# Altium PCB PCB1.PcbDoc (part 1 of 2)
Units mm, origin at the board's own origin, x right, y up, seen from the top; angles counter-clockwise.
Board outline 99 x 99 mm, 4 copper layers (TOP, GND, P, BOT), stack 1.591 mm thick; 114 components, 75 nets, 421 pads, 154 vias.
Unrouted connection lines stored in the file: 105.
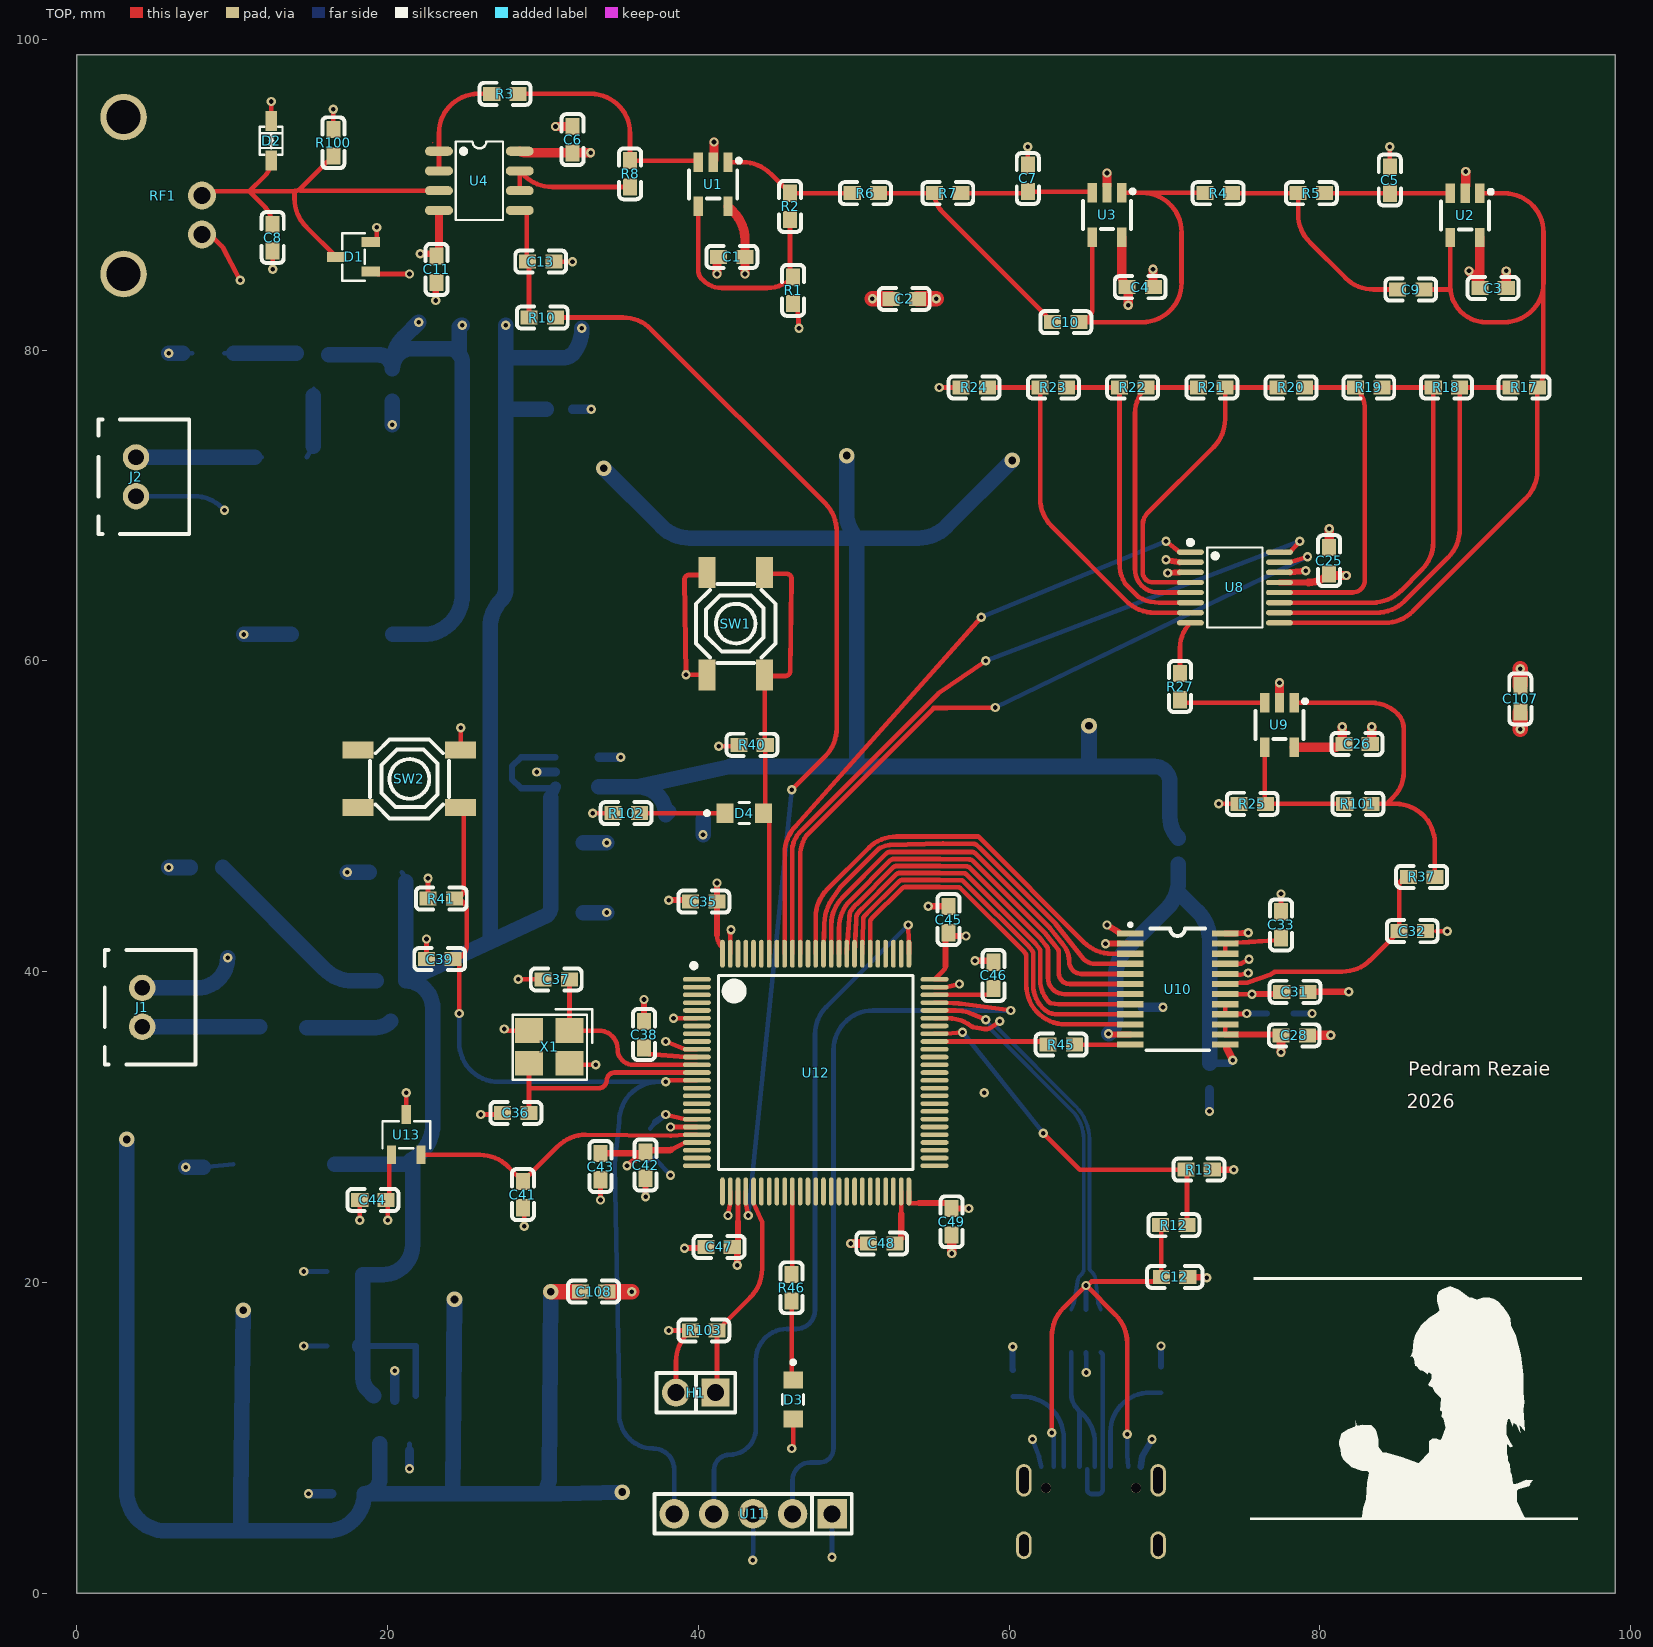
[diagram p0: TOP view]
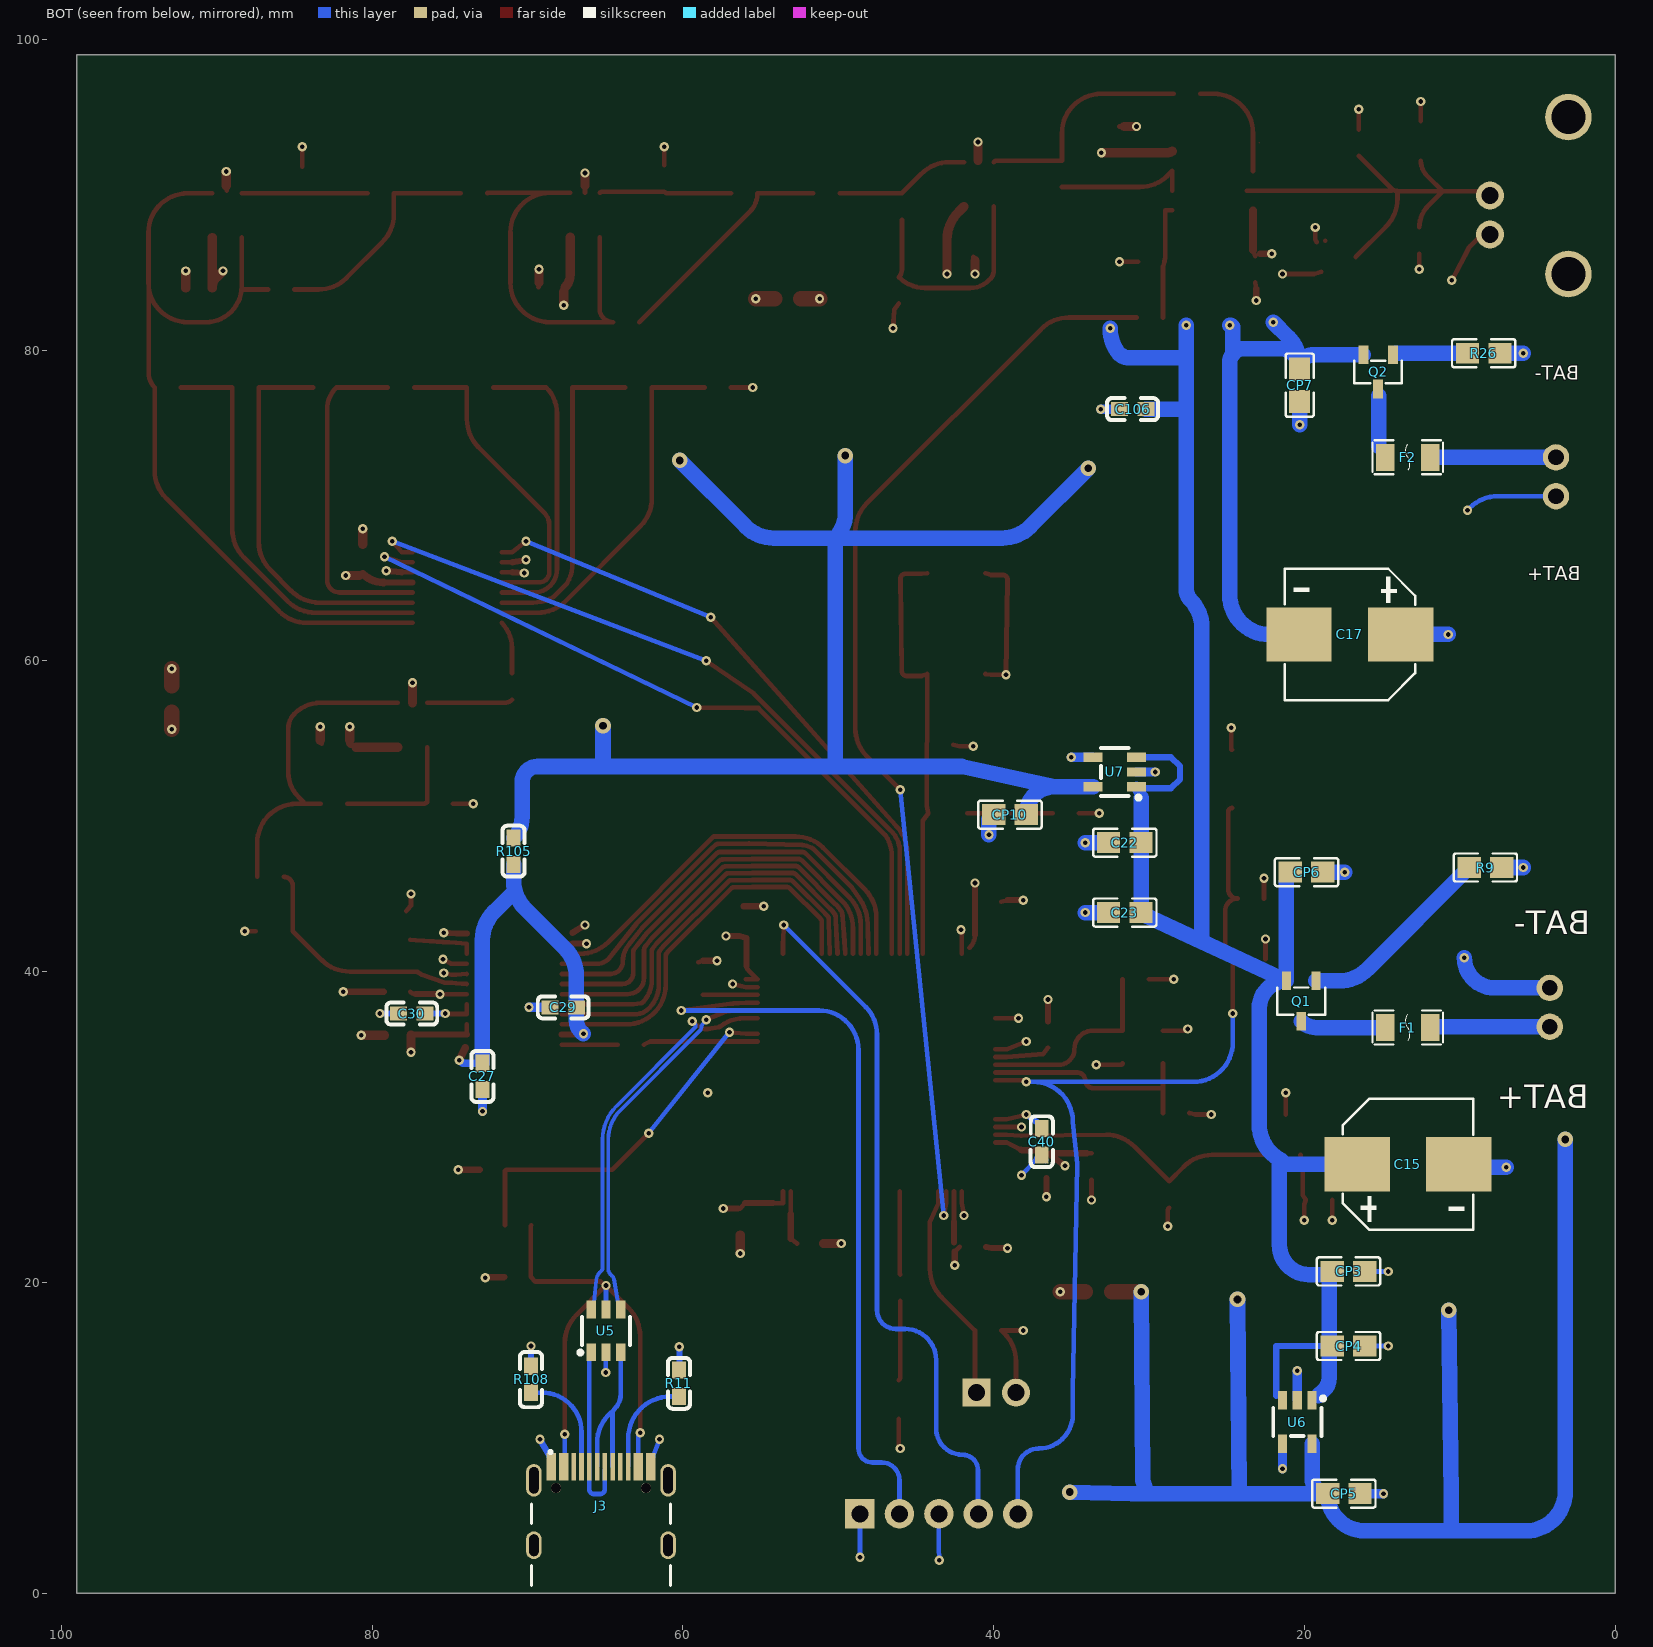
[diagram p1: BOT view, seen from below]
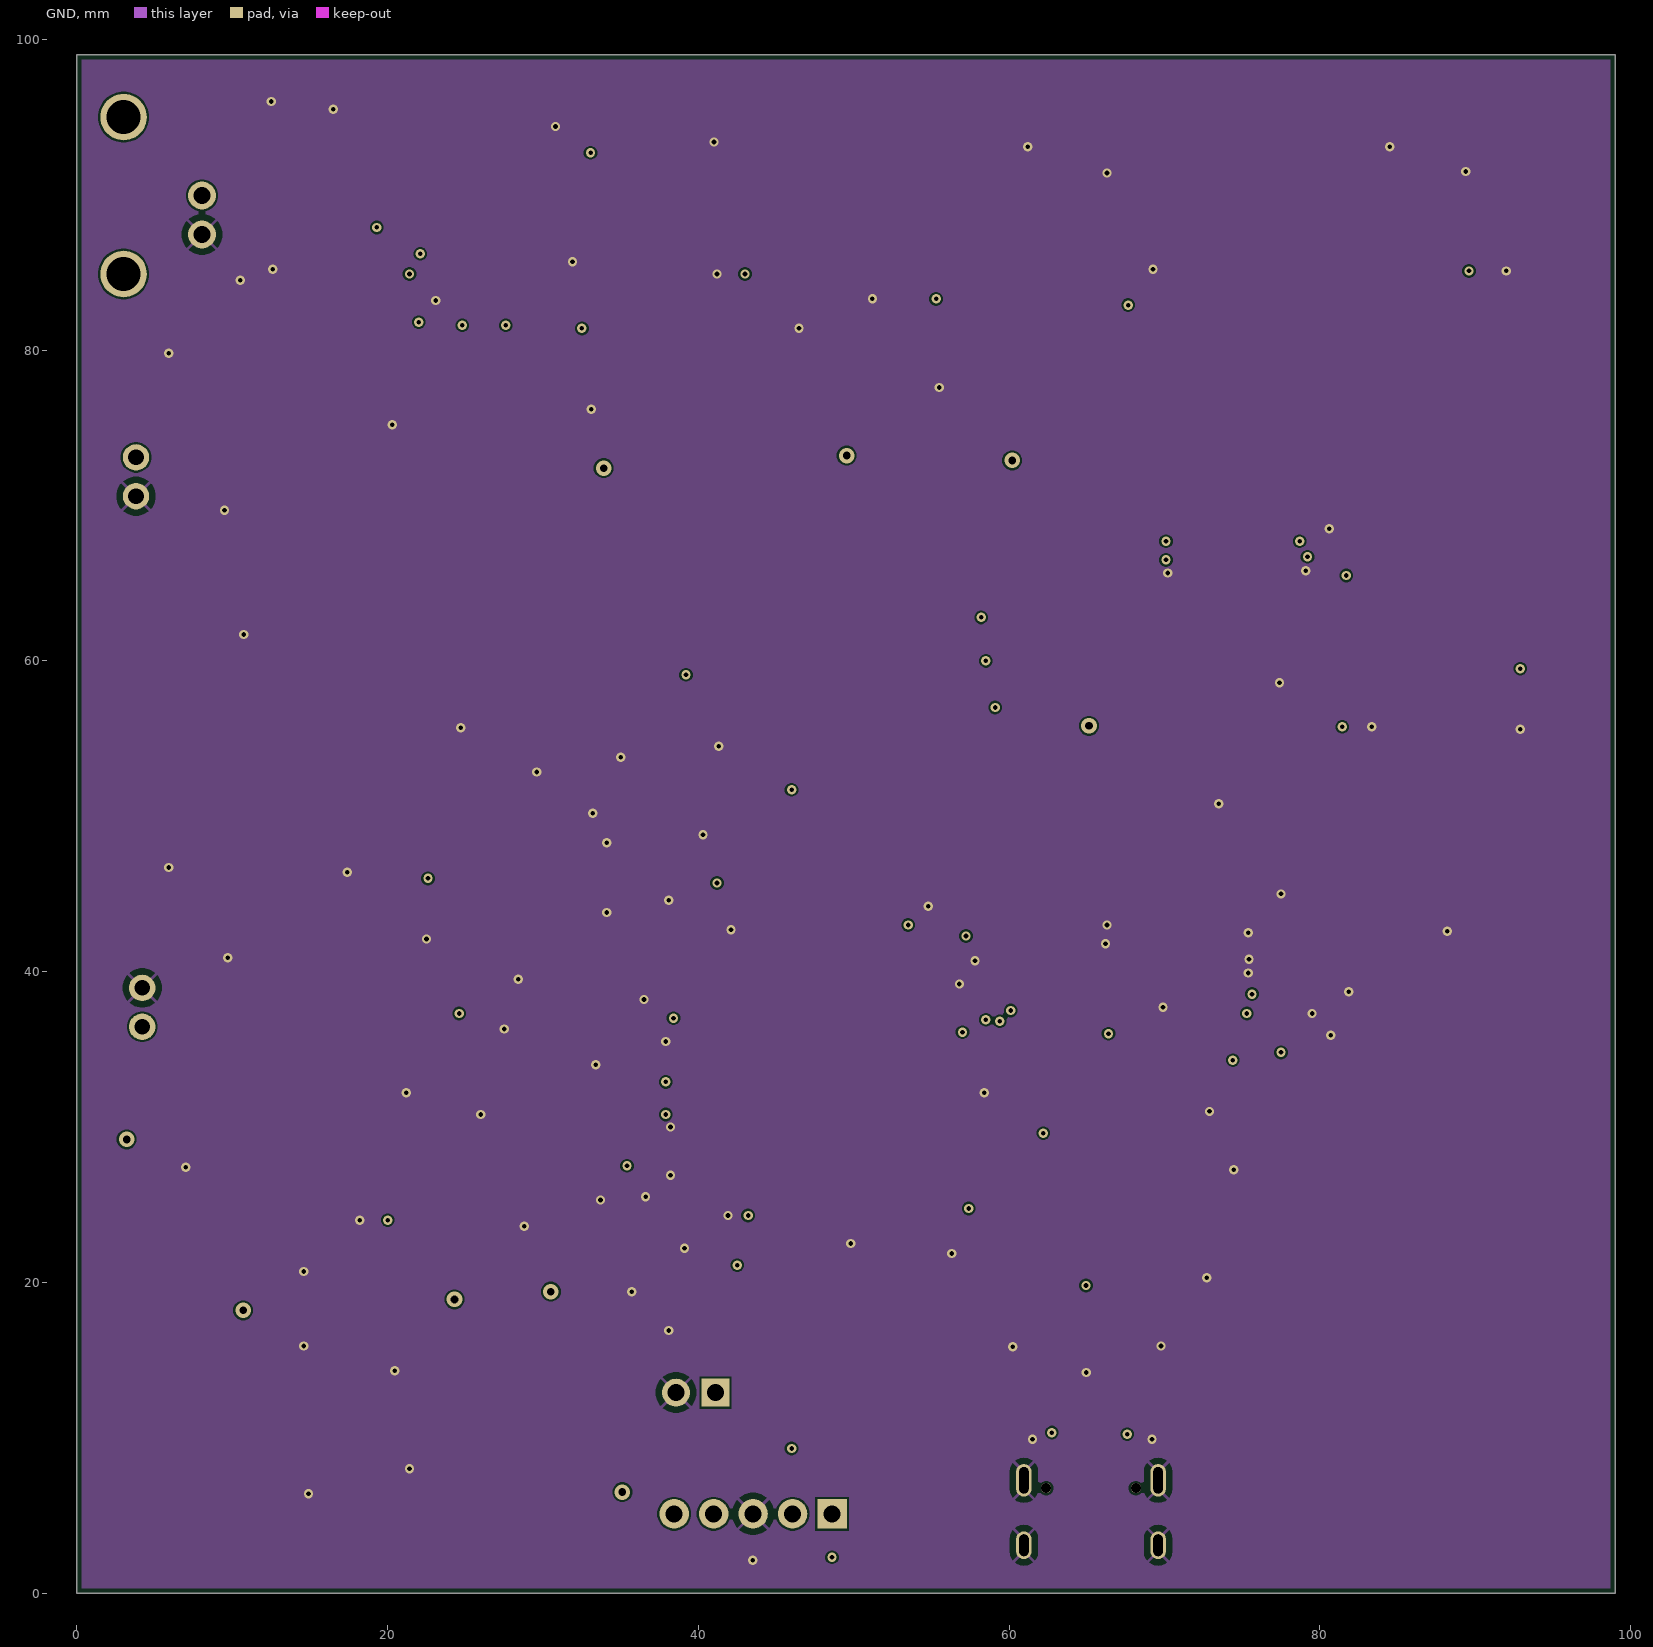
[diagram p2: GND]
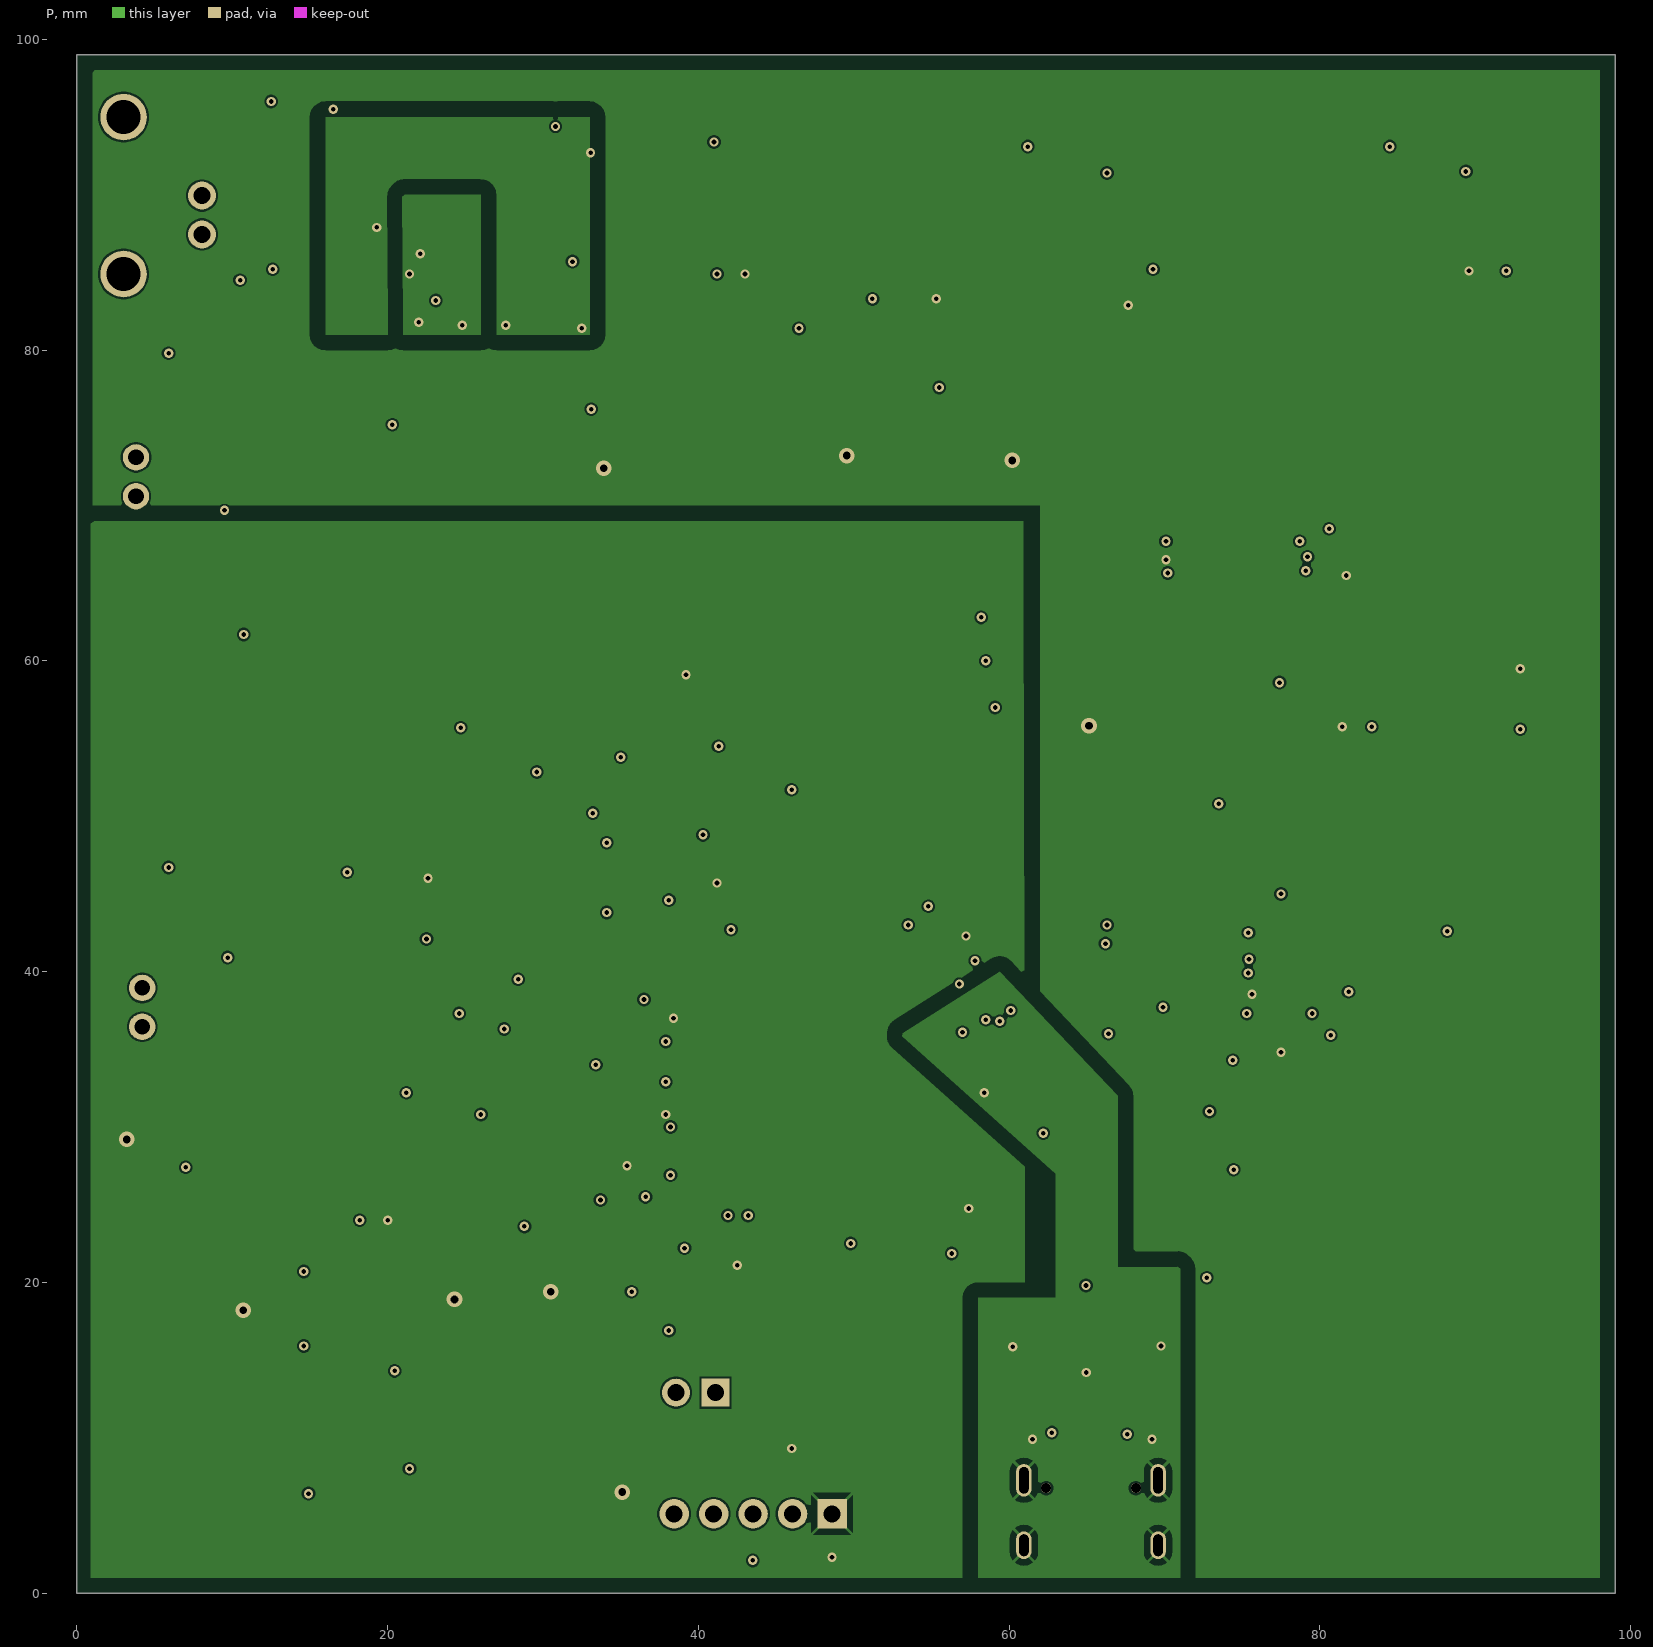
[diagram p3: P]

## Layer stack, top to bottom
Top Solder: solder mask 0.0102, Solder Resist, Dk 3.8
TOP: signal copper 0.035
Dielectric 1: prepreg 0.2104, PP-006, Dk 4.4
GND: signal copper 0.0175
Dielectric 2: dielectric 1.065, FR-4, Dk 4.4
P: signal copper 0.0175
Dielectric 3: prepreg 0.2104, PP-006, Dk 4.4
BOT: signal copper 0.035
Bottom Solder: solder mask 0.0102, Solder Resist, Dk 3.8

## Board outline
0,0 0,99 99,99 99,0

## Design rules (kind name [scope] priority, off if disabled: settings)
BoardOutlineClearance [All] p1: gap=0.254 ignorepadtopadclearanceinfootprint=FALSE except(0: Arc-SplitContinuation Track-SplitContinuation SMDPad-SplitContinuation THPad-SplitContinuation Via-SplitContinuation Fill-SplitContinuation Poly-SplitContinuation Region-SplitContinuation Text-SplitContinuation; 0.3: Arc-OutlineEdge Track-OutlineEdge SMDPad-OutlineEdge Fill-OutlineEdge Poly-OutlineEdge Region-OutlineEdge Text-OutlineEdge; 0.5: THPad-OutlineEdge Via-OutlineEdge)
Clearance [All] p1: gap=0.127 ignorepadtopadclearanceinfootprint=FALSE except(1: Fill-Fill Fill-Poly Fill-Region Poly-Poly Poly-Region Region-Region)
ComponentClearance [All] p1: gap=1.5 collisioncheckmode=3 verticalgap=2540 showdistances=TRUE
DiffPairsRouting USB [InDifferentialPair('USB')] p1: maxlimit=0.127 minlimit=0.127 mostfreqgap=0.127 toplayer_minwidth=0.24 toplayer_maxwidth=0.24 toplayer_prefwidth=0.24 midlayer1_minwidth=0.152 midlayer1_maxwidth=0.152 midlayer1_prefwidth=0.152 midlayer2_minwidth=0.152 midlayer2_maxwidth=0.152 midlayer2_prefwidth=0.152 bottomlayer_minwidth=0.24 bottomlayer_maxwidth=0.24 bottomlayer_prefwidth=0.24 impedanceprofiledriven=TRUE impedanceprofileid={34407DA7-253E-4A37-A9AF-6DE2CBFCFED3} impedanceprofilevalue=90.000000 maxuncoupledlength=12.7
HoleSize [All] p1: absolutevalues=TRUE maxlimit=2539.975 minlimit=0.3 maxpercent=80.000 minpercent=20.000
HoleToHoleClearance [All] p1: gap=0.5 allowstackedmicrovias=TRUE
MinimumAnnularRing [All] p1: minimumring=0.15
MinimumSolderMaskSliver [All] p1: minsoldermaskwidth=0.1
PolygonConnect [All] p1: thpad.connectstyle=Relief thpad.reliefconductorwidth=0.2 thpad.reliefentries=4 thpad.polygonreliefangle="45 Angle" thpad.airgapwidth=0.4 smdpad.connectstyle=Relief smdpad.reliefconductorwidth=0.25 smdpad.reliefentries=4 smdpad.polygonreliefangle="45 Angle" smdpad.airgapwidth=0.38 via.connectstyle=Direct via.reliefconductorwidth=0.254 via.reliefentries=4 via.polygonreliefangle="90 Angle" via.airgapwidth=0.254
RoutingVias [All] p1: holewidth=0.3 width=0.6 viastyle="Through Hole" minholewidth=0.3 minwidth=0.6 maxholewidth=0.5 maxwidth=0.8
SilkToSolderMaskClearance [IsPad] p1: minsilkscreentomaskgap=0 clearancetoexposedcopper=TRUE
SolderMaskExpansion [All] p1: expansion=0.102 istentingtop=FALSE
SupplyNets "Schematic Supply Nets_1" [InNet('3V3A_D')] p1: voltage=0.000
SupplyNets "Schematic Supply Nets_2" [InNet('GND')] p2: voltage=0.000
SupplyNets "Schematic Supply Nets_5" [InNet('3V3D')] p3: voltage=0.000
SupplyNets "Schematic Supply Nets_4" [InNet('3V3A')] p4: voltage=0.000
SupplyNets "Schematic Supply Nets_3" [InNet('VBAT+')] p5: voltage=0.000
SupplyNets "Schematic Supply Nets" [InNet('VBAT-')] p6: voltage=0.000
Width [All] p1: maxlimit=1 minlimit=0.2 preferedwidth=0.3 minimp=50.000000 maximp=50.000000 favimp=50.000000
24 further rules are at their usual default settings.

## Classes and differential pairs
component class STM32: C35 C36 C37 C38 C39 C40 C41 C42 C43 C44 C45 C46 C47 C48 C49 C108 D2 D3 D4 H1 R40 R41 R45 R46 R102 R103 RF1 SW1 SW2 U11 U12 U13 X1
component class PGA: C25 C26 R17 R18 R19 R20 R21 R22 R23 R24 R25 R27 R101 U8 U9
component class POWER: C12 C15 C17 C22 C23 CP3 CP4 CP5 CP6 CP7 CP10 F1 F2 J1 J2 J3 Q1 Q2 R9 R11 R12 R13 R26 R105 R108 U5 U6 U7
component class LEVELSHIFT: C1 C2 C3 C4 C5 C6 C7 C8 C9 C10 C11 C13 C106 C107 D1 R1 R2 R3 R4 R5 R6 R7 R8 R10 R100 U1 U2 U3 U4
component class ADC: C27 C28 C29 C30 C31 C32 C33 R37 U10

## Components (designator, comment, footprint, x,y, rotation, side; value= is the part's Value field where it differs from the comment)
C1 "Cap" 0603 42.15,86 r180 top value=100nF
C2 "Cap" 0603 53.25,83.3 r180 top value=10uF
C3 "Cap" 0603 91.15,84 r0 top value=100nF
C4 "Cap" 0603 68.437,84.05 r0 top value=100nF
C5 "Cap" 0603 84.5,90.95 r90 top value=200pF
C6 "Cap" 0603 31.9,93.55 r270 top value=100nF
C7 "Cap" 0603 61.2,91.05 r270 top value=560pF
C8 "Cap" 0603 12.6,87.25 r90 top value=3.3pF
C9 "Cap" 0603 85.85,83.9 r180 top value=2nF
C10 "Cap" 0603 63.65,81.8 r180 top value=750pF
C11 "Cap" 0603 23.15,85.2 r270 top value=100nF
C12 "Cap" 0603 70.65,20.35 r180 top value=100nF
C13 "Cap" 0603 29.85,85.7 r180 top value=1uF
C15 "100uF" CAP-SMD_BD8.0-L8.3-W8.3-FD 13.333,27.6 r180 bottom
C17 "100uF" CAP-SMD_BD8.0-L8.3-W8.3-FD 17.067,61.7 r0 bottom
C22 "Cap" 0805 31.592,48.286 r180 bottom value=100nF
C23 "Cap" 0805 31.592,43.786 r180 bottom value=10uF
C25 "Cap" 0603 80.6,66.45 r270 top value=100nF
C26 "Cap" 0603 82.391,54.659 r0 top value=100nF
C27 "Cap" 0603 72.9,33.25 r270 bottom value=0.1uF
C28 "Cap" 0603 78.35,35.9 r0 top value=0.1uF
C29 "Cap" 0603 67.7,37.7 r180 bottom value=0.1uF
C30 "Cap" 0603 77.45,37.3 r180 bottom value=10uF
C31 "Cap" 0603 78.4,38.7 r180 top value=0.1uF
C32 "Cap" 0603 85.95,42.6 r0 top value=47pF
C33 "Cap" 0603 77.5,43 r270 top value=10uF
C35 "Cap" 0603 40.35,44.5 r0 top value=100nF
C36 "Cap" 0603 28.25,30.9 r0 top value=22pF
C37 "Cap" 0603 30.85,39.5 r0 top value=22pF
C38 "Cap" 0603 36.5,35.95 r270 top value=100nF
C39 "Cap" 0603 23.35,40.8 r0 top value=100nF
C40 "Cap" 0603 36.9,29.05 r90 bottom value=100nF
C41 "Cap" 0603 28.7,25.65 r90 top value=100nF
C42 "Cap" 0603 36.6,27.55 r90 top value=100nF
C43 "Cap" 0603 33.7,27.45 r90 top value=1uF
C44 "Cap" 0603 19.05,25.3 r0 top value=100nF
C45 "Cap" 0603 56.1,43.35 r270 top value=100nF
C46 "Cap" 0603 59,39.75 r90 top value=2,2uF
C47 "Cap" 0603 41.329,22.279 r0 top value=100nF
C48 "Cap" 0603 51.8,22.5 r180 top value=2,2uF
C49 "Cap" 0603 56.3,23.9 r90 top value=100nF
C106 "Cap" 0603 31.05,76.2 r0 bottom value=10uF
C107 "Cap" 0603 92.9,57.55 r270 top value=10uF
C108 "Cap" 0603 33.25,19.4 r180 top value=10uF
CP3 "Cap" 0805 17.118,20.714 r0 bottom value=100nF (schematic designator C19)
CP4 "Cap" 0805 17.118,15.914 r0 bottom value=10uF (schematic designator C20)
CP5 "Cap" 0805 17.418,6.414 r0 bottom value=10uF (schematic designator C21)
CP6 "Cap" 0805 19.818,46.414 r0 bottom value=100nF (schematic designator C16)
CP7 "Cap" 0805 20.314,77.782 r270 bottom value=100nF (schematic designator C18)
CP10 "Cap" 0805 38.982,50.086 r180 bottom value=10uF (schematic designator C24)
D1 "YLED0805YG" SOT-23-3 17.8,86 r0 top
D2 "GBLC08CI-LF-T7" SOD-323_L1.8-W1.3-LS2.5-BI 12.5,93.475 r90 top
D3 "YLED0805YG" FP-LTST-C171KGKT-MFG 46.1,12.45 r270 top
D4 "YLED0805YG" FP-LTST-C171KGKT-MFG 42.95,50.2 r0 top
F1 "nSMD050-33V" 1206 13.345,36.4 r0 bottom
F2 "nSMD050-33V" 1206 13.345,73.1 r0 bottom
H1 "A2541WV-2P" HDR-TH_P2.54-H-M_A2541WV-2P 39.83,12.9 r180 top
J1 "B2B-XH-A(LF)(SN)" B2B-XH-A(LF)(SN) 4.2,37.7 r270 top
J2 "B2B-XH-A(LF)(SN)" B2B-XH-A(LF)(SN) 3.8,71.85 r270 top
J3 "GCT_USB4930-00-A_REVA" GCT_USB4930-00-A_REVA 65.27,5.452 r180 bottom
Q1 "AO3401A" SOT-23-3_L2.9-W1.6-P1.90-LS2.8-BR 20.2,38.1 r90 bottom
Q2 "AO3400A" SOT-23-3_L2.9-W1.3-P1.90-LS2.4-BR 15.25,78.6 r90 bottom
R1 "Res1" 0603 46.1,83.85 r90 top value=1k
R2 "Res1" 0603 45.9,89.25 r90 top value=1k
R3 "Res1" 0603 27.55,96.5 r0 top value=1k
R4 "Res1" 0603 73.45,90.1 r180 top value=64.9
R5 "Res1" 0603 79.45,90.1 r180 top value=237
R6 "Res1" 0603 50.75,90.1 r180 top value=82.5
R7 "Res1" 0603 56.05,90.1 r180 top value=178
R8 "Res1" 0603 35.6,91.35 r90 top value=1k
R9 "Res1" 0805 8.382,46.686 r180 bottom value=100k (schematic designator R14)
R10 "Res1" 0603 29.95,82.1 r0 top value=100k
R11 "Res1" 0603 60.25,13.5 r90 bottom value=5.1K
R12 "Res1" 0603 70.6,23.675 r0 top value=47k
R13 "Res1" 0603 72.225,27.25 r180 top value=22k
R17 "Res1" 0603 93.15,77.6 r0 top value=47
R18 "Res1" 0603 88.15,77.6 r0 top value=47
R19 "Res1" 0603 83.15,77.6 r0 top value=47
R20 "Res1" 0603 78.15,77.6 r0 top value=47
R21 "Res1" 0603 73.05,77.6 r0 top value=47
R22 "Res1" 0603 67.95,77.6 r0 top value=47
R23 "Res1" 0603 62.85,77.6 r0 top value=47
R24 "Res1" 0603 57.75,77.6 r0 top value=47
R25 "Res1" 0603 75.65,50.8 r0 top value=143
R26 "Res1" 0805 8.418,79.814 r0 bottom value=100k (schematic designator R104)
R27 "Res1" 0603 71,58.35 r90 top value=100
R37 "Res1" 0603 86.55,46.1 r180 top value=47
R40 "Res1" 0603 43.45,54.6 r180 top value=10k
R41 "Res1" 0603 23.45,44.7 r0 top value=10k
R45 "Res1" 0603 63.35,35.3 r0 top value=22
R46 "Res1" 0603 46,19.65 r270 top value=1k
R100 "Res1" 0603 16.5,93.35 r270 top value=1M
R101 "Res1" 0603 82.45,50.8 r0 top value=1K
R102 "Res1" 0603 35.35,50.2 r180 top value=1k
R103 "Res1" 0603 40.35,16.9 r180 top value=1k
R105 "Res1" 0603 70.9,47.75 r270 bottom value=47
R108 "Res1" 0603 69.775,13.75 r90 bottom value=5.1K
RF1 "3GHz" ANT-TH_KH-BNC50-3511 5.525,89.95 r270 top
SW1 "TS-1187A-B-A-B" SKQGABE010 42.4,62.4 r270 top
SW2 "TS-1187A-B-A-B" SKQGABE010 21.4,52.4 r180 top
U1 "OPA356AIDBVT" SOT-23-5 40.95,90.675 r90 top
U2 "OPA356AIDBVT" SOT-23-5 89.35,88.675 r90 top
U3 "OPA356AIDBVT" SOT-23-5 66.3,88.7 r90 top
U4 "OPA1656IDR" SOIC-8 25.9,90.9 r270 top
U5 "USBLC6-2SC6_C5261088" SOT-23-6_L2.9-W1.6-P0.95-LS2.8-BR 64.95,16.875 r270 bottom
U6 "AP2112K-3.3TRG1(MS)" SOT-23-5_L2.9-W1.6-P0.95-LS2.7-BR 20.45,11 r90 bottom
U7 "AP2112K-3.3TRG1(MS)" SOT-23-5_L2.9-W1.6-P0.95-LS2.7-BR 32.2,52.85 r180 bottom
U8 "ADG708CRUZ-REEL7" TSSOP-16 74.534,64.725 r270 top
U9 "OPA356AIDBVT" SOT-23-5 77.4,55.875 r90 top
U10 "ADC1173CIMTCX/NOPB" TSSOP-24 70.852,38.875 r0 top
U11 "2541WV-05P" HDR-TH_5P-P2.54-V-M 43.52,5.1 r180 top
U12 "STM32F407VGT6" LQFP-100_L14.0-W14.0-P0.50-LS16.0-BL 47.55,33.5 r270 top
U13 "REF3030AIDBZR" SOT-23-3_L2.9-W1.6-P1.90-LS2.8-BR_2 21.2,29.5 r270 top
X1 "8MHz" CRYSTAL-SMD_4P-L3.2-W2.5-BL 30.4,35.15 r180 top

## Footprints (in the part's own frame and the unit in brackets; to place one, negate y for a bottom-side part, rotate by r counter-clockwise, add the part's x,y. Pads: shape width x height; smd on the part's side, far side on the other; paste and mask are expansions set on the pad)
0603 [mm]
  rect 1.1x0.9 smd: 1(-0.85,0) 2(0.85,0)
  silkscreen extent -1.64,-0.71 1.64,0.71
0805 [mm]
  rect 1.5x1.35 smd mask+0.051: 1(-1.008,0.014) 2(1.082,0.014)
  silkscreen extent -2,-0.89 2.08,0.92
1206 [mm]
  rect 1.19x1.728 smd: 1(-1.445,0) 2(1.445,0)
  silkscreen extent -2.27,-1.09 2.27,1.09
ANT-TH_KH-BNC50-3511 [mm]
  round 1.8 hole 1.1 paste-2539.97 mask+0.05: 1(0,2.525) 2(2.5,2.525)
  round 3 hole 2.2 paste-2539.97 mask+0.05: 3(5.05,-2.525) 4(-5.05,-2.525)
B2B-XH-A(LF)(SN) [mm]
  round 1.7 hole 1: 1(1.25,0) 2(-1.25,0)
  silkscreen extent -3.68,-2.41 3.68,3.43
CAP-SMD_BD8.0-L8.3-W8.3-FD [mm]
  rect 4.2x3.5 smd: 1(-3.267,0) 2(3.267,0)
  silkscreen extent -4.2,-4.23 4.2,4.23
CRYSTAL-SMD_4P-L3.2-W2.5-BL [mm]
  rect 1.8x1.6 smd: 1(-1.3,-1.05) 2(1.3,-1.05) 3(1.3,1.05) 4(-1.3,1.05)
  silkscreen extent -2.78,-2.42 2.35,2.1
FP-LTST-C171KGKT-MFG [mm]
  rect 1.1x1.25 smd paste+0 mask+0: 1(-1.25,0) 2(1.25,0)
  silkscreen extent -2.52,-0.67 0.33,0.67, body extent -1.9,-0.77 1.9,0.77, height 0.25
GCT_USB4930-00-A_REVA [mm]
  rect 0.6x1.75 smd paste+0 mask+0.025: A1_B12(-3.2,2.678) A4_B9(-2.4,2.678) B1_A12(3.2,2.678) B4_A9(2.4,2.678)
  rect 0.3x1.75 smd paste+0 mask+0.025: A5(-1.25,2.678) A6(-0.25,2.678) A7(0.25,2.678) A8(1.25,2.678) B5(1.75,2.678) B6(0.75,2.678) B7(-0.75,2.678) B8(-1.75,2.678)
  oval 1x2.1 hole 0.6 slot 1.7 at 90 deg mask+0.102: SH1(-4.32,1.803) SH2(4.32,1.803)
  oval 1x1.8 hole 0.6 slot 1.4 at 90 deg mask+0.102: SH3(-4.32,-2.377) SH4(4.32,-2.377)
  round 0.65 hole 0.65 unplated mask+0: ""(-2.89,1.303) ""(2.89,1.303)
  silkscreen extent -4.47,-4.98 4.47,3.72
HDR-TH_5P-P2.54-V-M [mm]
  rect 1.9x1.9 hole 1.1: 1(-5.08,0)
  round 1.9 hole 1.1: 2(-2.54,0) 3(0,0) 4(2.54,0) 5(5.08,0)
  silkscreen extent -6.35,-1.27 6.35,1.27
HDR-TH_P2.54-H-M_A2541WV-2P [mm]
  rect 1.8x1.8 hole 1.1: 1(-1.27,0)
  round 1.8 hole 1.1: 2(1.27,0)
  silkscreen extent -2.54,-1.27 2.54,1.27
LQFP-100_L14.0-W14.0-P0.50-LS16.0-BL [mm]
  oval 0.3x1.8 smd mask+0.025: 1(-6,-7.65) 2(-5.5,-7.65) 3(-5,-7.65) 4(-4.5,-7.65) 5(-4,-7.65) 6(-3.5,-7.65) 7(-3,-7.65) 8(-2.5,-7.65) 9(-2,-7.65) 10(-1.5,-7.65) 11(-1,-7.65) 12(-0.5,-7.65) 13(0,-7.65) 14(0.5,-7.65) 15(1,-7.65) 16(1.5,-7.65) 17(2,-7.65) 18(2.5,-7.65) 19(3,-7.65) 20(3.5,-7.65) 21(4,-7.65) 22(4.5,-7.65) 23(5,-7.65) 24(5.5,-7.65) 25(6,-7.65) 51(6,7.65) 52(5.5,7.65) 53(5,7.65) 54(4.5,7.65) 55(4,7.65) 56(3.5,7.65) 57(3,7.65) 58(2.5,7.65) 59(2,7.65) 60(1.5,7.65) 61(1,7.65) 62(0.5,7.65) 63(0,7.65) 64(-0.5,7.65) 65(-1,7.65) 66(-1.5,7.65) 67(-2,7.65) 68(-2.5,7.65) 69(-3,7.65) 70(-3.5,7.65) 71(-4,7.65) 72(-4.5,7.65) 73(-5,7.65) 74(-5.5,7.65) 75(-6,7.65)
  oval 1.8x0.3 smd mask+0.025: 26(7.65,-6) 27(7.65,-5.5) 28(7.65,-5) 29(7.65,-4.5) 30(7.65,-4) 31(7.65,-3.5) 32(7.65,-3) 33(7.65,-2.5) 34(7.65,-2) 35(7.65,-1.5) 36(7.65,-1) 37(7.65,-0.5) 38(7.65,0) 39(7.65,0.5) 40(7.65,1) 41(7.65,1.5) 42(7.65,2) 43(7.65,2.5) 44(7.65,3) 45(7.65,3.5) 46(7.65,4) 47(7.65,4.5) 48(7.65,5) 49(7.65,5.5) 50(7.65,6) 76(-7.65,6) 77(-7.65,5.5) 78(-7.65,5) 79(-7.65,4.5) 80(-7.65,4) 81(-7.65,3.5) 82(-7.65,3) 83(-7.65,2.5) 84(-7.65,2) 85(-7.65,1.5) 86(-7.65,1) 87(-7.65,0.5) 88(-7.65,0) 89(-7.65,-0.5) 90(-7.65,-1) 91(-7.65,-1.5) 92(-7.65,-2) 93(-7.65,-2.5) 94(-7.65,-3) 95(-7.65,-3.5) 96(-7.65,-4) 97(-7.65,-4.5) 98(-7.65,-5) 99(-7.65,-5.5) 100(-7.65,-6)
  silkscreen extent -7.03,-8 6.25,6.25
SKQGABE010 [mm]
  rect 2x1.1 smd: 1(-3.3,1.85) 2(3.3,1.85) 3(-3.3,-1.85) 4(3.3,-1.85)
  silkscreen extent -2.55,-2.55 2.55,2.55
SOD-323_L1.8-W1.3-LS2.5-BI [mm]
  rect 1.3x0.75 smd: 1(-1.275,0) 2(1.275,0)
  silkscreen extent -0.9,-0.73 0.9,0.73
SOIC-8 [mm]
  oval 0.588x1.8 smd paste+0 mask+0.051: 1(-1.905,-2.6) 2(-0.635,-2.6) 3(0.635,-2.6) 4(1.905,-2.6) 5(1.905,2.6) 6(0.635,2.6) 7(-0.635,2.6) 8(-1.905,2.6)
  TOP region: -2.42,-3 -2.42,-2.988 -2.438,-2.97 -2.462,-2.97 -2.48,-2.988 -2.48,-3 -2.48,-3.012 -2.462,-3.03 -2.438,-3.03 -2.42,-3.012 -2.42,-3 -2.42,-3
  silkscreen extent -2.53,-1.52 2.53,1.52
SOT-23-3 [mm]
  rect 1.2x0.65 smd: 1(1.1,-0.95) 2(1.1,0.95) 3(-1.1,0)
  silkscreen extent -0.73,-1.53 0.73,1.53
SOT-23-3_L2.9-W1.3-P1.90-LS2.4-BR [mm]
  rect 1.2x0.65 smd: 1(1.1,-0.95) 2(1.1,0.95) 3(-1.1,0)
  silkscreen extent -0.73,-1.53 0.73,1.53
SOT-23-3_L2.9-W1.6-P1.90-LS2.8-BR [mm]
  rect 1.2x0.6 smd paste+0 mask+0.051: 1(1.3,-0.95) 2(1.3,0.95) 3(-1.3,0)
  silkscreen extent -0.88,-1.54 0.88,1.54
SOT-23-3_L2.9-W1.6-P1.90-LS2.8-BR_2 [mm]
  rect 1.2x0.6 smd paste+0 mask+0.051: 1(1.3,-0.95) 2(1.3,0.95) 3(-1.3,0)
  silkscreen extent -0.88,-1.54 0.88,1.54
SOT-23-5 [mm]
  rect 1.25x0.6 smd: 1(1.425,-0.95) 2(1.425,0) 3(1.425,0.95) 4(-1.425,0.95) 5(-1.425,-0.95)
  silkscreen extent -0.9,-1.78 1.65,1.55
SOT-23-5_L2.9-W1.6-P0.95-LS2.7-BR [mm] "AP2112K-3.3TRG1(MS)"
  rect 1.2x0.6 smd: 1(1.4,-0.95) 2(1.4,0) 3(1.4,0.95) 4(-1.4,0.95) 5(-1.4,-0.95)
  silkscreen extent -0.9,-1.78 1.65,1.55
SOT-23-6_L2.9-W1.6-P0.95-LS2.8-BR [mm]
  rect 1.15x0.6 smd paste+0 mask+0.051: 1(1.375,-0.95) 2(1.375,0) 3(1.375,0.95) 4(-1.375,0.95) 5(-1.375,0) 6(-1.375,-0.95)
  silkscreen extent -0.9,-1.78 1.52,1.55
TSSOP-16 [mm]
  oval 0.343x1.731 smd: 1(-2.275,-2.866) 2(-1.625,-2.866) 3(-0.975,-2.866) 4(-0.325,-2.866) 5(0.325,-2.866) 6(0.975,-2.866) 7(1.625,-2.866) 8(2.275,-2.866) 9(2.275,2.866) 10(1.625,2.866) 11(0.975,2.866) 12(0.325,2.866) 13(-0.325,2.866) 14(-0.975,2.866) 15(-1.625,2.866) 16(-2.275,2.866)
  silkscreen extent -3.05,-3.02 2.58,1.77
TSSOP-24 [mm]
  rect 1.7x0.4 smd mask+0.05: 1(-3.048,3.575) 2(-3.048,2.925) 3(-3.048,2.275) 4(-3.048,1.625) 5(-3.048,0.975) 6(-3.048,0.325) 7(-3.048,-0.325) 8(-3.048,-0.975) 9(-3.048,-1.625) 10(-3.048,-2.275) 11(-3.048,-2.925) 12(-3.048,-3.575) 13(3.048,-3.575) 14(3.048,-2.925) 15(3.048,-2.275) 16(3.048,-1.625) 17(3.048,-0.975) 18(3.048,-0.325) 19(3.048,0.325) 20(3.048,0.975) 21(3.048,1.625) 22(3.048,2.275) 23(3.048,2.925) 24(3.048,3.575)
  silkscreen extent -3.13,-3.94 2.01,4.22

## Part data
C1 C2 C3 C4 C5 C6 C7 C8 C9 C10 C11 C12 C13 C22 C23 C25 C26 C27 C28 C29 C30 C31 C32 C33 C35 C36 C37 C38 C39 C40 C41 C42 C43 C44 C45 C46 C47 C48 C49 C106 C107 C108 CP3 CP4 CP5 CP6 CP7 CP10: "Capacitor", LatestRevisionDate=17-Jul-2002, LatestRevisionNote="Re-released for DXP Platform.", PackageDescription="Radial Cap, Thru-Hole; 2 Leads; 0.3 in Pin Spacing", PackageReference=RAD-0.3, Published=8-Jun-2000, Publisher="Altium Limited"
C15 C17: library part VT1H101M0810, "100 µF, 50 V aluminum electrolytic capacitor, ±20%, SMD, 8 × 10.2 mm, 105°C"
D1: library part BAS7004E6327HTSA1, "Dual Schottky diode, 70 V, 70 mA, SOT-23 package."
D2: "Bidirectional TVS/ESD protection diode, 8 V standoff, 13.4 V clamping, 0.6 pF capacitance"
D3 D4: library part CMP-22017-000037-1, "LED GREEN CLEAR SMD", Case Code (Imperial)=0805, Case Code (Metric)=2012, Color=Green, Forward Current=30mA, Forward Voltage=2.4V, Lens Color=Colorless, Max Operating Temperature=85°C, Min Operating Temperature=-55°C, Package Quantity=1, Power Dissipation=75mW, Reverse Voltage=5V, Test Current=20mA, Case/Package=0805, Depth=1.25mm, Dominant Wavelength=571nm, Height=0.8mm, Illumination Color=Green, Lead Free="Lead Free", Length=2mm, Lens Style=Rectangular, Lens Transparency=Clear, Luminous Intensity=35mcd, Mount="Surface Mount", Number of Elements=1, Number of LEDs=1, Number of Pins=2, Packaging="Tape and Reel", Power Rating=75mW, Radiation Hardening=No, Viewing Angle=130°, Wavelength=574nm, Width=1.25mm
F1 F2: "Resettable PTC fuse, 0.5 A hold current, 33 V max"
H1: library part A2541WV-2P_C225477, "2-pin male pin header, 2.54 mm pitch, single-row, straight through-hole, 3 A, 250 V."
J1 J2: "2-pin JST XH series wire-to-board header, 2.5 mm pitch, straight through-hole, 3 A, 250 V"
J3: "Type C USB 2.0 Connector"
Q1: library part AO3401A_C5379091, "P-channel MOSFET, −30 V, −4 A, low RDS(on)"
Q2: library part AO3400A_C42419946, "N-channel MOSFET, 30 V, 5.7 A, low RDS(on)"
R1 R2 R3 R4 R5 R6 R7 R8 R9 R10 R11 R12 R13 R17 R18 R19 R20 R21 R22 R23 R24 R25 R26 R27 R37 R40 R41 R45 R46 R100 R101 R102 R103 R105 R108: "Resistor", LatestRevisionDate=17-Jul-2002, LatestRevisionNote="Re-released for DXP Platform.", PackageDescription="Axial Device, Thru-Hole; 2 Leads; 0.3 in Pin Spacing", PackageReference=AXIAL-0.3, Published=8-Jun-2000, Publisher="Altium Limited"
RF1: library part KH-BNC50-3511, "50 Ω right-angle BNC PCB connector, through-hole, DC–3 GHz, 9.5 mm interface"
SW1 SW2: "SMD tactile pushbutton switch, SPST-NO, 12 V, 50 mA, 5.1 × 5.1 × 1.5 mm."
U1 U2 U3 U9: "High-speed CMOS single operational amplifier, 200 MHz GBW, rail-to-rail output"
U4: "Dual FET-input audio op-amp, 2.9nV/√Hz, 53MHz GBW, SOIC-8"
U6 U7: "3.3 V, 600 mA fixed-output LDO regulator with enable"
U8: "8:1 low-voltage analog multiplexer/switch, 4.5 Ω max RON, 55 MHz bandwidth"
U10: "8-bit, 15 MSPS single-channel ADC, 3 V supply"
U11: "5-pin single-row male pin header, 2.54 mm pitch, through-hole, straight."
U13: "3.0 V precision voltage reference, ±0.2% accuracy, 25 mA output"
X1: library part 0132M4-8000F18DZNGL

## Via types
v1: diameter 0.6, hole 0.3, TOP to BOT, tented both sides, 137 vias
v2: diameter 1, hole 0.5, TOP to BOT, tented both sides, 9 vias
v3: diameter 0.6, hole 0.3, TOP to BOT, 8 vias

## Nets (pads, with @x,y where several pads share a name; then routed paths per layer and width w, separated by ;. In a path a pad name is that pad's centre, name@x,y a point inside that pad or via, vN(x,y) a via of type N, cw(c..) or ccw(c..) an arc to the next point about the centre after c; other vN are vias at no path point)
3V3A: C1.1 C2.1 C3.1 C4.1 C25.2 C26.1 C28.1 C31.2 C107.1 CP10.2 R105.1 U1.5 U2.5 U3.5 U7.5 U8.2 U8.13 U9.5 U10.14 U10.15 U10.18 | length 132.4
  TOP w0.3: C4.1@67.587,84.05 C4.1@67.662,83.75 ; U8.2@70.974,66.35 U8.2@71.668,66.35 ; U10.14@73.9,35.95 U10.15@73.9,36.6 ; U10.18@73.9,38.55 75.187,38.55 75.278,38.55 v1(75.634,38.55) ; C31.2@77.188,38.55 ccw(c77.188,39.062) C31.2@77.55,38.7 ; C28.1@77.45,35.95 C28.1@77.5,35.9 ; C26.1@81.038,54.45 ccw(c81.038,55.162) C26.1@81.541,54.659 cw(c81.783,54.9) C26.1@81.441,54.9
  TOP w0.4: v1(70.1,66.5) U8.2@70.974,66.35 ; U10.14@73.9,35.95 C28.1@77.45,35.95 ; v1(75.634,38.55) C31.2@77.188,38.55 ; U8.13@77.4,65.05 79.272,65.05
  TOP w0.5: 79.272,65.05 ccw(c79.272,66.928) C25.2@80.6,65.6
  TOP w0.6: U1.5@41.9,89.25 42.256,88.894 cw(c40.46,87.098) 43,87.098 C1.1@43,86 v1(43,84.9) ; U3.5@67.25,87.275 67.25,84.865 ccw(c68.402,84.865) C4.1@67.587,84.05 ; v1(67.662,82.9) C4.1@67.662,83.75 ; v1(77.5,34.8) C28.1@77.5,35.9 ; U9.5@78.35,54.45 C26.1@81.038,54.45 ; C25.2@80.841,65.5 v1(81.7,65.5) ; C26.1@81.441,54.9 v1(81.441,55.759) ; v1(89.6,85.1) 90.017,84.683 cw(c89.334,84) C3.1@90.3,84 U2.5@90.3,87.25
  TOP w1: C2.1@54.1,83.3 v1(55.3,83.3) ; C107.1@92.9,58.4 v1(92.9,59.5)
  BOT w1: U7.5@33.6,51.9 36.1,51.9 ; v2(33.9,72.4) 37.656,68.644 ccw(c39.452,70.44) 39.452,67.9 50.2,67.9 ; CP10.2@38.075,50.275 CP10.2@37.9,50.1 ccw(c36.1,50.1) 36.1,51.9 ; v2(49.541,73.217) 49.541,69.491 ccw(c51.791,69.491) 50.2,67.9 ; v2(60.2,72.9) 55.944,68.644 cw(c54.148,70.44) 54.148,67.9 50.2,67.9 ; v2(65.141,55.817) 65.141,53.2 ; R105.1@70.9,48.6 cw(c72.246,49.944) 70.344,49.944 70.344,52.201 ccw(c69.344,52.2) 69.344,53.2 65.141,53.2 ; 36.1,51.9 42.052,53.2 50.2,53.2 ; 50.2,53.2 50.2,67.9 ; 50.2,53.2 65.141,53.2
3V3A_D: C27.1 C29.2 R105.2 U10.11 U10.13 | length 28.1
  TOP w0.3: v1(66.4,36) ccw(c66.52,36.12) v1@66.52,35.95
  TOP w0.4: v1@66.52,35.95 U10.11@67.804,35.95
  TOP w0.5: 74,35.1 v1(74.4,34.3)
  BOT w0.5: C27.1@72.9,34.1 74,34.1 ccw(c74,34.6) v1(74.4,34.3)
  BOT w1: v1(66.4,36) ccw(c65.85,36.835) 66.85,36.833 C29.2@66.85,37.7 66.85,39.698 cw(c69.39,39.698) 67.594,41.494 70.156,44.056 ccw(c68.36,45.852) 70.9,45.852 R105.2@70.9,46.9 ; 70.9,45.1 72.156,43.844 cw(c70.36,42.048) 72.9,42.048 C27.1@72.9,34.1
3V3D: C35.2 C40.2 C42.2 C43.2 C44.2 C45.2 C47.2 C49.2 C108.2 CP5.2 D3.2 R41.1 SW1.3 SW1.4 U6.5 U11.1 U12.6 U12.19 U12.22 U12.28 U12.50 U12.75 U12.100 U13.1 | length 153.4
  TOP w0.3: v1(20,24) 20,25 C44.2@19.9,25.3 20.1,25.6 20.1,27.75 U13.1@20.25,28.2 ; R41.1@22.6,44.7 v1(22.6,46) ; C43.2@33.7,28.3 C43.2@34,28.31 ; C42.2@36.3,28.157 36.365,28.224 C42.2@36.6,28.4 C42.2@36.9,28.495 ; v1(37.9,30.8) 39.15,30.5 U12.19@39.9,30.5 ; 38.248,28.529 39.15,29 U12.22@39.9,29 ; v1(38.4,37) 39.15,37 U12.6@39.9,37 ; 39.104,65.226 v1(39.2,59.1) 40.175,59.1 SW1.4@40.525,59.15 ; 39.104,65.227 cw(c39.404,65.23) 39.404,65.53 40.175,65.53 SW1.3@40.525,65.65 ; 41.2,42.37 ccw(c42.395,42.37) U12.100@41.55,41.525 ; C47.2@42.179,22.279 C47.2@42.5,21.979 ; 42.55,23.9 U12.28@42.55,25.85 ; v1(46,9.3) ccw(c45.759,9.541) 46.1,9.541 D3.2@46.1,11.2 ; U12.50@53.55,25.85 53.55,25.1 54.2,25.1 ; 55.9,40.366 cw(c55.5,40.366) 55.783,40.083 U12.75@55.2,39.5 U12.75@55.95,39.5 ; C49.2@56,25.1 C49.2@56.3,24.75 ; C49.2@56.194,24.856 ccw(c56.45,25.112) C49.2@56.45,24.75
  TOP w0.4: C43.2@34,28.31 C42.2@36.3,28.31 ; v1(35.4,27.5) C42.2@36.3,28.157 ; C42.2@36.9,28.495 38.109,28.495 ccw(c38.109,28.795) 38.248,28.529 ; 41.2,42.37 C35.2@41.2,44.5 v1(41.2,45.7) ; v1(42.5,21.1) C47.2@42.5,21.979 ; C47.2@42.55,22.579 42.55,23.9 ; 54.2,25.1 C49.2@56,25.1 ; 55.9,40.366 55.9,42.15 56.35,42.291 v1(57.219,42.291) ; C49.2@56.45,24.75 v1(57.4,24.75)
  TOP w1: v2(30.5,19.4) C108.2@32.4,19.4
  BOT w0.3: C40.2@36.9,29.9 C40.2@37.2,30.3 ; v1(48.6,2.3) U11.1@48.6,5.1
  BOT w0.4: C40.2@37.2,30.3 v1(37.9,30.8)
  BOT w1: v2(3.2,29.2) 3.2,6.54 ccw(c5.74,6.54) 5.74,4 10.55,4 ; v2(10.7,18.2) 10.55,6.26 ccw(c11.55,6.247) 10.55,6.247 10.55,4 ; U6.5@19.5,9.6 19.5,7.4 cw(c18.5,7.4) CP5.2@18.5,6.4 ; v2(24.3,18.9) 24.2,6.4 ; v2(30.5,19.4) 30.405,7.392 cw(c29.405,7.4) 30.343,7.051 30.1,6.4 ; v2(35.1,6.5) 31.112,6.4 cw(c31.087,7.4) 31.087,6.4 30.1,6.4 ; 10.55,4 16.1,4 ccw(c16.1,6.4) CP5.2@18.5,6.4 ; CP5.2@18.5,6.4 24.2,6.4 ; 24.2,6.4 30.1,6.4
ADC_D0: U10.3 U12.88 | length 28.2
  TOP w0.3: U12.88@47.55,41.15 47.55,43.498 cw(c50.09,43.498) 48.294,45.294 50.956,47.956 cw(c52.752,46.16) 52.752,48.7 58,48.7 64.806,41.894 ccw(c66.602,43.69) 66.602,41.15 U10.3@67.804,41.15
ADC_D1: U10.4 U12.87 | length 27.6
  TOP w0.3: U12.87@48.05,41.15 48.101,43.077 cw(c51.09,42.998) 48.606,44.662 49.1,45.4 51.576,47.876 cw(c52.6,46.851) 51.592,47.892 cw(c52.6,46.851) 51.593,47.893 cw(c51.801,47.676) 51.64,47.93 cw(c52.752,46.16) 51.642,47.931 cw(c51.801,47.676) 51.692,47.956 52.056,48.097 cw(c52.341,47.359) 52.318,48.15 55.739,48.25 cw(c55.747,47.95) 55.751,48.25 57.725,48.219 ; 57.727,48.219 cw(c57.721,47.919) 57.933,48.131 58.133,47.93 62.96,43.104 cw(c62.747,42.892) 62.982,43.08 64.792,40.809 ccw(c65.025,40.997) 64.829,40.77 ccw(c65.558,41.621) 65.558,40.5 U10.4@67.804,40.5
ADC_D2: U10.5 U12.86 | length 27.3
  TOP w0.3: U12.86@48.55,41.15 48.55,42.998 cw(c51.09,42.998) 49.294,44.794 52.1,47.6 cw(c52.341,47.359) 52.341,47.7 57.603,47.7 ; 57.604,47.7 cw(c57.602,47.4) 57.813,47.613 57.976,47.451 cw(c57.448,46.919) 57.978,47.449 62.606,42.822 cw(c62.075,42.291) 62.608,42.82 62.625,42.802 cw(c62.412,42.591) 62.645,42.78 62.646,42.779 63.486,41.725 cw(c62.104,40.624) 63.871,40.638 ; 63.871,40.638 ccw(c64.658,40.637) 64.659,39.85 U10.5@67.804,39.85
ADC_D3: U10.6 U12.85 | length 27.1
  TOP w0.3: U12.85@49.05,41.15 49.05,42.798 cw(c51.59,42.798) 49.794,44.594 52.362,47.162 cw(c52.574,46.95) 52.574,47.25 53.32,47.25 55.547,47.25 cw(c55.547,46.95) 55.551,47.25 ; 55.552,47.25 57.453,47.219 57.454,47.219 cw(c57.447,46.919) 57.658,47.132 57.787,47.004 cw(c57.258,46.472) 57.788,47.003 62.269,42.522 cw(c61.739,41.991) 62.272,42.519 62.289,42.502 cw(c62.076,42.291) 62.309,42.48 62.31,42.478 62.786,41.88 ; 62.787,41.88 63.135,41.442 cw(c62.9,41.255) 63.2,41.258 63.2,39.9 ccw(c63.9,39.9) 63.9,39.2 U10.6@67.804,39.2
ADC_D4: U10.7 U12.84 | length 26.7
  TOP w0.3: U12.84@49.55,41.15 49.601,41.929 cw(c50.05,41.9) 49.601,41.933 49.71,43.44 cw(c53.59,43.16) 49.743,43.737 49.744,43.74 cw(c50.04,43.693) 49.779,43.842 cw(c51.59,42.798) 49.781,43.844 cw(c50.04,43.693) 49.784,43.85 49.834,43.931 cw(c50.473,43.538) 49.845,43.948 cw(c50.222,43.703) 49.846,43.95 cw(c51.59,42.798) 49.849,43.955 cw(c50.223,43.705) 49.851,43.957 cw(c50.473,43.538) 49.869,43.983 ; 49.87,43.983 49.943,44.083 cw(c50.908,43.37) 49.983,44.134 cw(c50.908,43.37) 49.985,44.137 ; 49.985,44.137 cw(c51.59,42.798) 49.993,44.146 cw(c50.336,43.855) 49.994,44.148 cw(c50.679,43.564) 49.996,44.15 cw(c50.908,43.37) 50.044,44.203 50.162,44.325 cw(c51.35,43.18) 50.177,44.341 cw(c50.818,43.709) 50.18,44.344 ; 50.181,44.344 52.549,46.712 cw(c52.761,46.5) 52.761,46.8 52.947,46.8 55.541,46.8 cw(c55.539,46.05) 55.546,46.8 55.548,46.8 57.263,46.772 57.265,46.772 cw(c57.257,46.472) 57.469,46.685 57.597,46.557 cw(c57.069,46.025) 57.599,46.556 61.933,42.221 cw(c61.403,41.691) 61.935,42.219 61.953,42.202 cw(c61.74,41.99) 61.972,42.18 61.974,42.178 62.291,41.78 cw(c61.705,41.312) 62.293,41.778 62.435,41.598 cw(c62.2,41.412) 62.5,41.414 ; 62.5,41.413 62.5,39.6 ccw(c63.55,39.6) 63.55,38.55 U10.7@67.804,38.55
ADC_D5: U10.8 U12.83 | length 26.3
  TOP w0.3: U12.83@50.05,41.15 50.154,43.324 cw(c53.59,43.16) 50.175,43.574 ; 50.175,43.575 cw(c50.473,43.538) 50.232,43.716 50.305,43.815 cw(c50.908,43.37) 50.331,43.849 ; 50.497,44.024 ccw(c51.35,43.18) 50.485,44.012 50.368,43.89 ccw(c50.908,43.37) 50.337,43.856 ccw(c50.679,43.564) 50.336,43.855 ccw(c51.59,42.798) 50.332,43.85 ; 50.497,44.025 cw(c51.35,43.18) 50.499,44.026 52.642,46.17 cw(c53.172,45.639) 52.643,46.171 52.736,46.263 cw(c52.948,46.05) 52.948,46.35 53.134,46.35 55.538,46.35 cw(c55.536,45.6) 55.542,46.35 55.544,46.35 57.074,46.325 57.076,46.325 cw(c57.068,46.025) 57.279,46.238 57.408,46.11 cw(c56.879,45.578) 57.409,46.109 61.597,41.921 cw(c61.067,41.39) 61.599,41.919 61.616,41.902 cw(c61.403,41.69) 61.636,41.879 61.638,41.878 61.738,41.751 ; 61.739,41.751 61.843,41.62 61.94,41.498 cw(c61.705,41.312) 62.005,41.314 ; 62.005,41.313 62.01,39.27 ccw(c64.153,39.478) 62.529,38.065 62.53,38.063 ccw(c62.755,38.262) 62.696,37.968 ccw(c63.399,41.589) 63.399,37.9 ; 63.401,37.9 U10.8@67.804,37.9 ; 50.332,43.85 ccw(c50.678,43.562) 50.331,43.849